# Altium PCB PCB1.PcbDoc (part 1 of 3)
Units mm, origin at the board's own origin, x right, y up, seen from the top; angles counter-clockwise.
Board outline 152.4 x 101.6 mm, 2 copper layers (Top Layer, Bottom Layer); 177 components, 83 nets, 484 pads, 115 vias.
Unrouted connection lines stored in the file: 7.
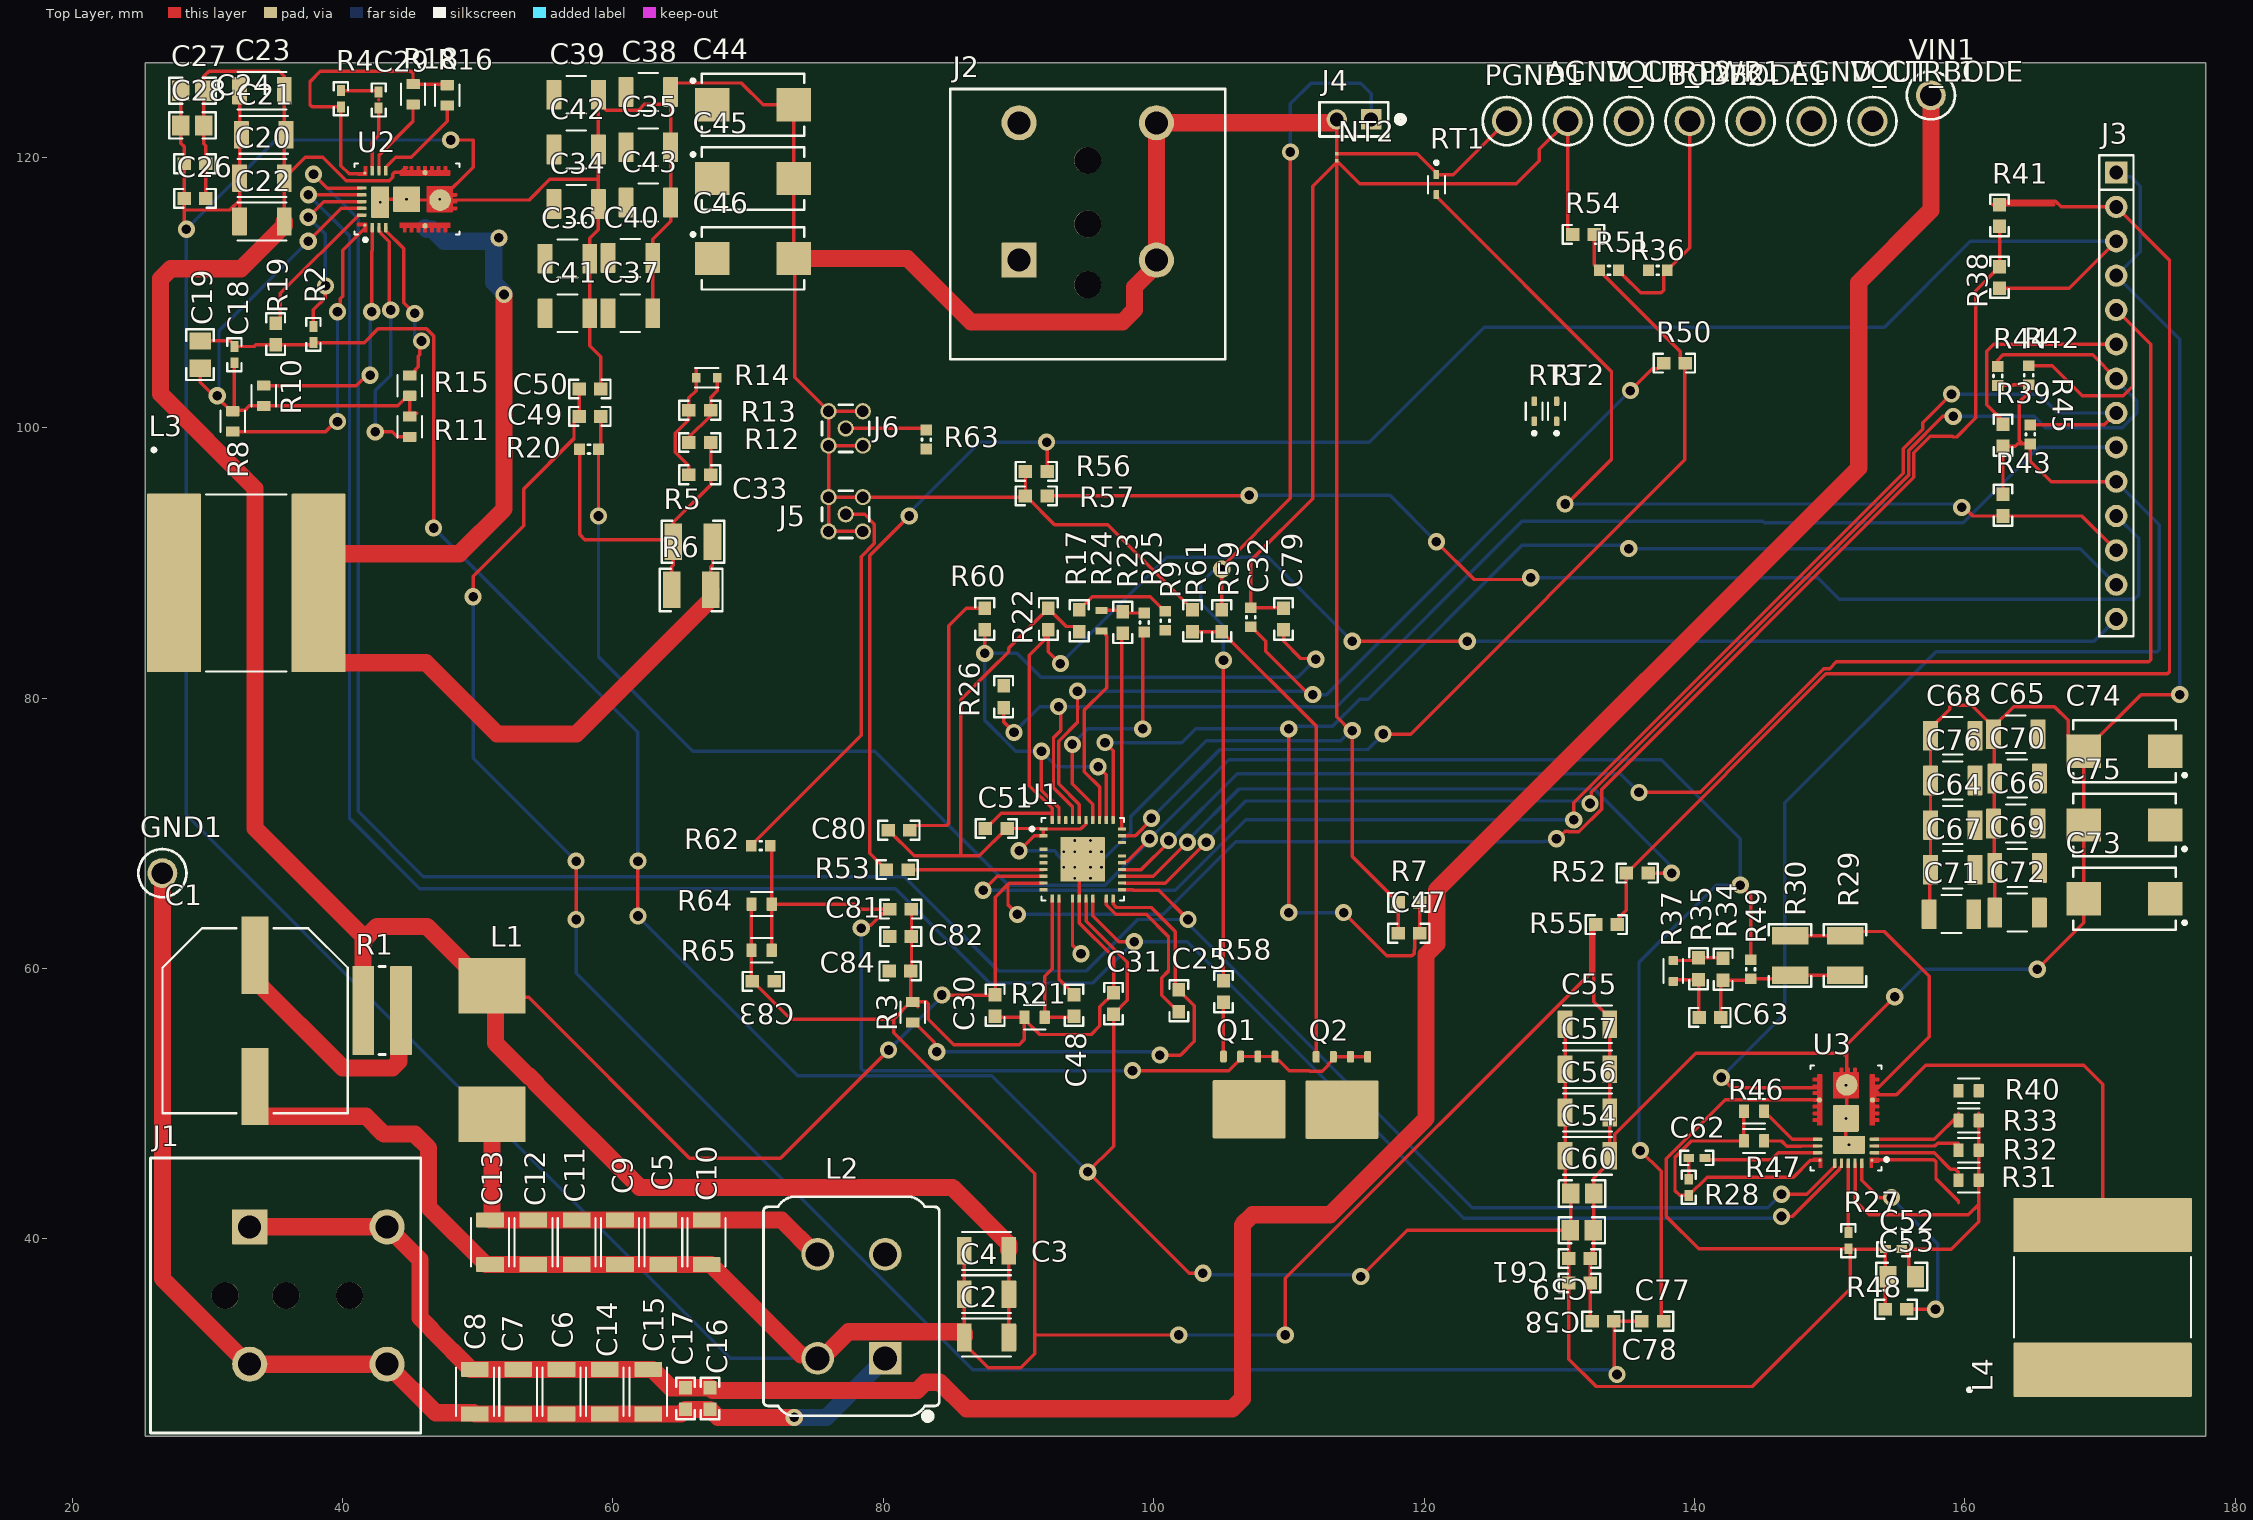
[diagram p0: Top Layer view]
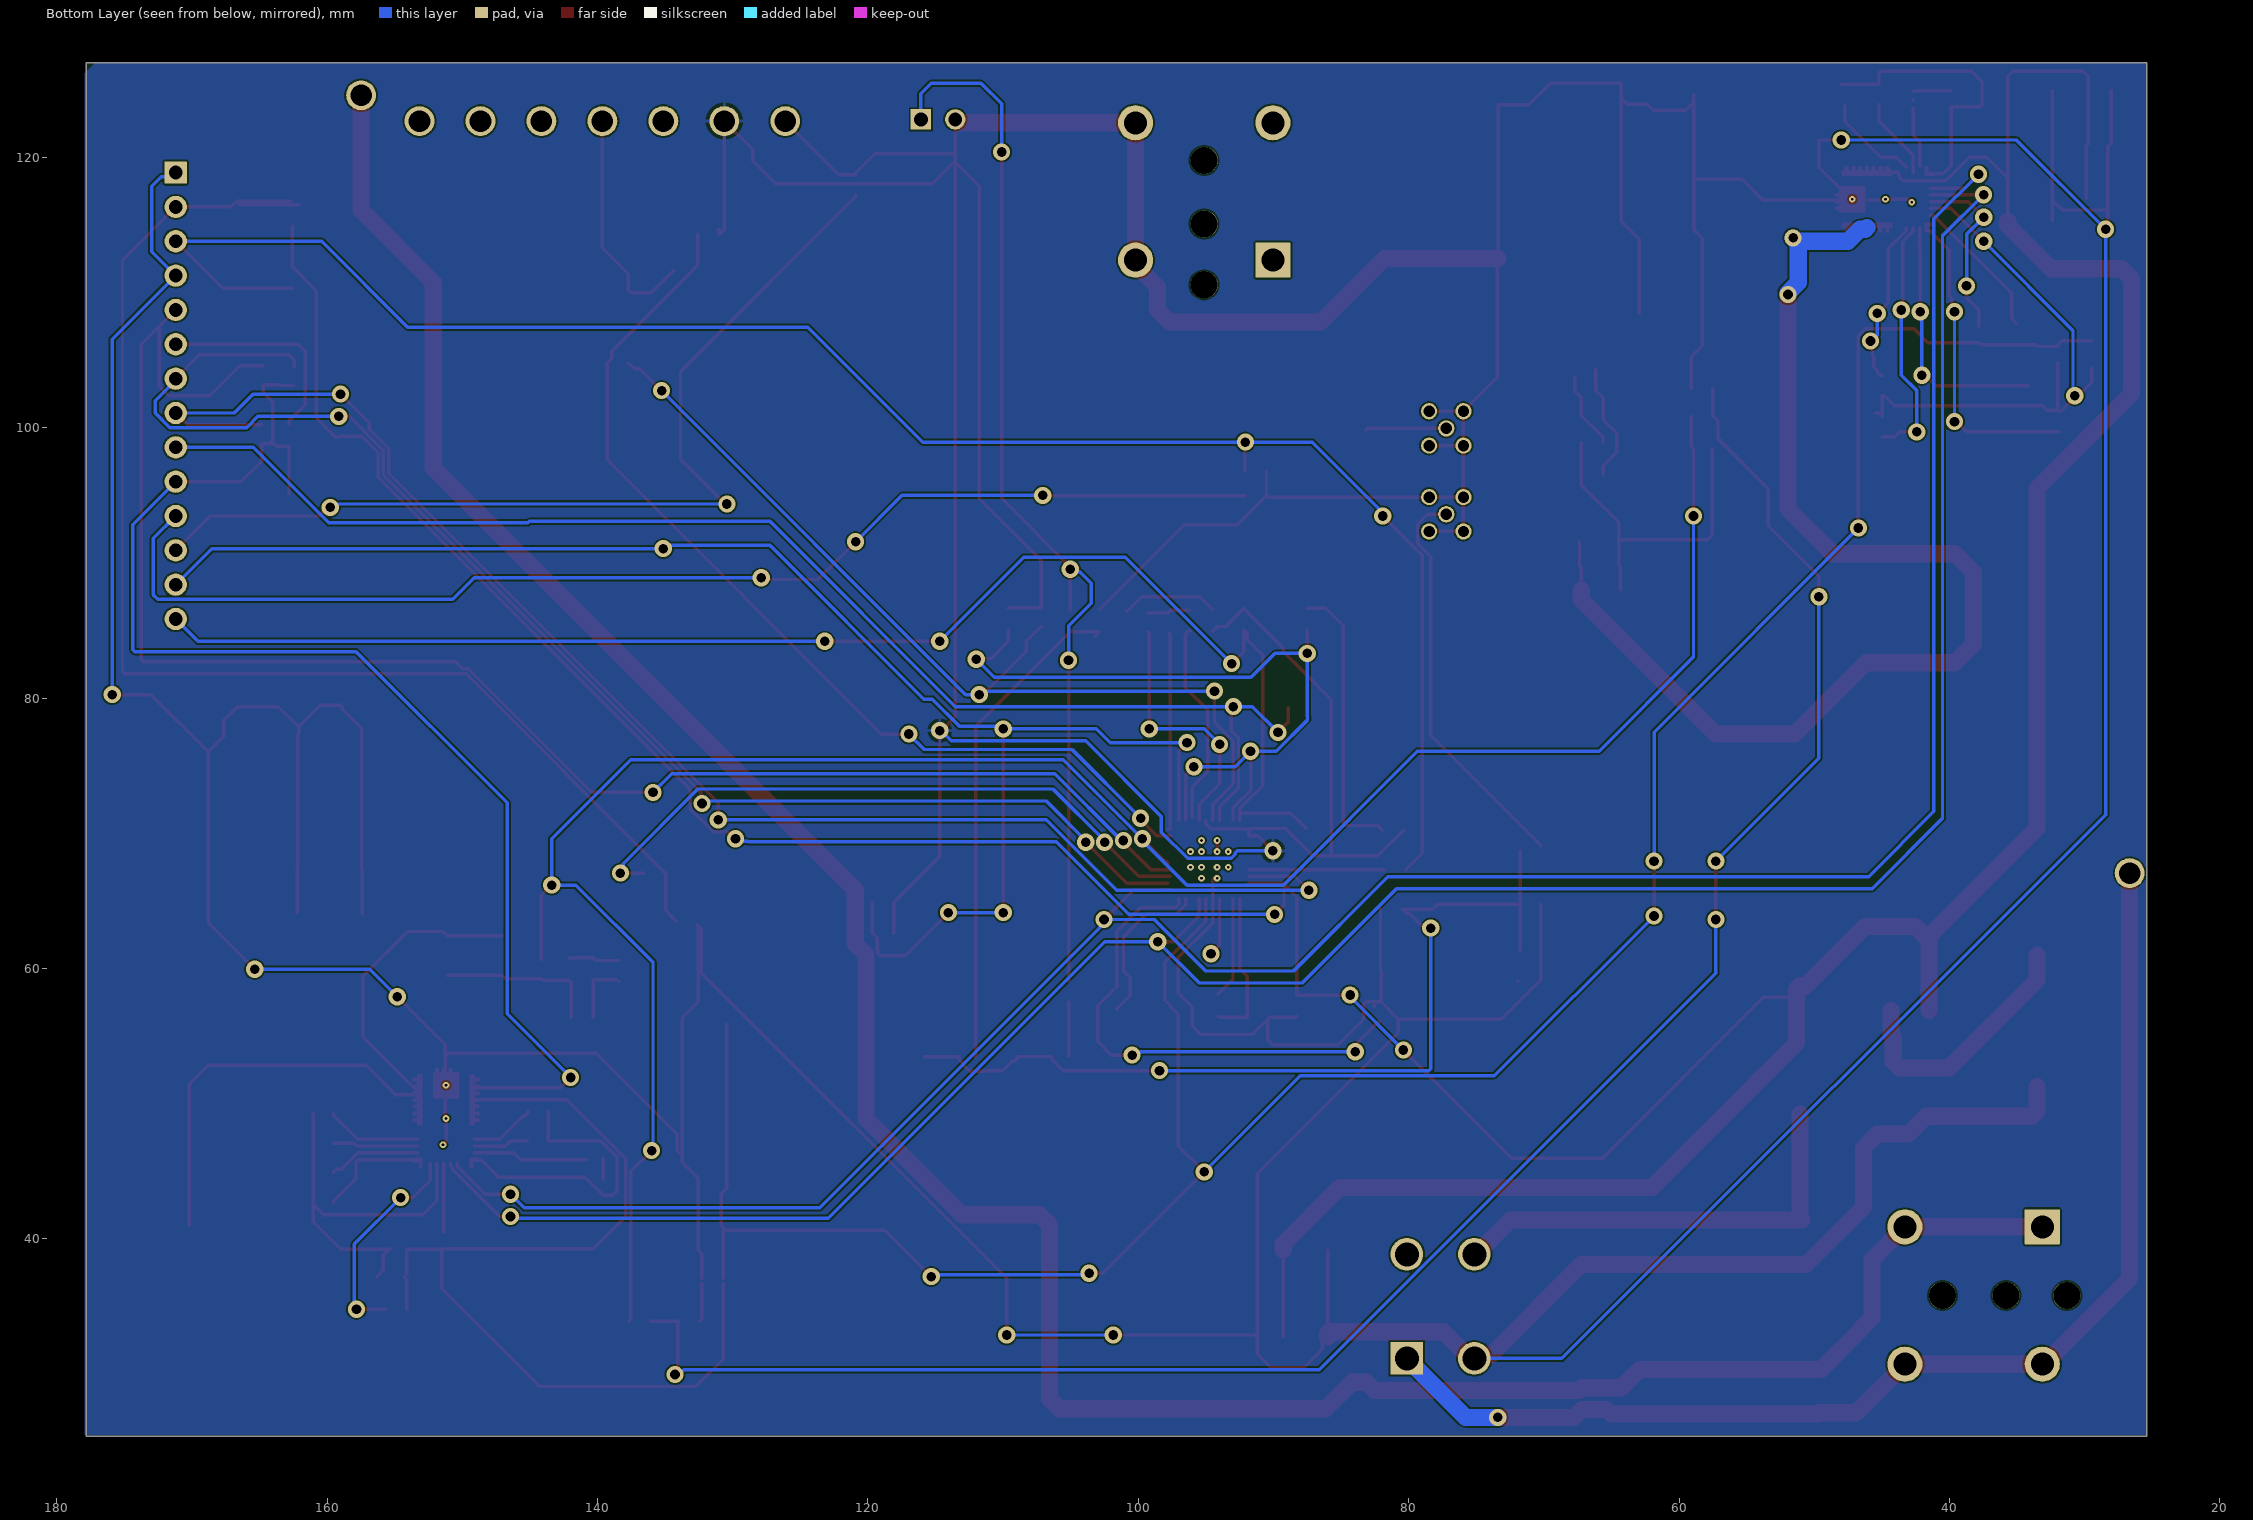
[diagram p1: Bottom Layer view, seen from below]

## Layer stack, top to bottom
Top Solder: solder mask 0.0102, Solder Resist, Dk 3.5
Top Layer: signal copper 0.0356
Dielectric 1: dielectric 0.32, FR-4, Dk 4.8
Bottom Layer: signal copper 0.0356
Bottom Solder: solder mask 0.0102, Solder Resist, Dk 3.5

## Board outline
25.4,25.4 177.8,25.4 177.8,127 25.4,127

## Design rules (kind name [scope] priority, off if disabled: settings)
Clearance [All] p1: gap=0.127 ignorepadtopadclearanceinfootprint=FALSE
PolygonConnect [All] p1: connectstyle=Relief reliefconductorwidth=0.254 reliefentries=4 polygonreliefangle="90 Angle" airgapwidth=0.254
RoutingVias [All] p1: holewidth=0.711 width=1.27 viastyle="Through Hole" minholewidth=0.711 minwidth=1.27 maxholewidth=0.711 maxwidth=1.27
SolderMaskExpansion [All] p1: expansion=0.102 istentingtop=FALSE
Width [All] p1: maxlimit=1.27 minlimit=0.127 preferedwidth=0.254 minimp=50.000000 maximp=50.000000 favimp=50.000000
30 further rules are at their usual default settings.

## Components (designator, comment, footprint, x,y, rotation, side; value= is the part's Value field where it differs from the comment)
AGND_CTRL1 "AGND_CTRL" Keystone5011 148.653,122.682 r90 top
AGND_CTRL2 "AGND_CTRL" Keystone5011 130.619,122.682 r90 top
BODE1 "BODE" Keystone5012 144.145,122.682 r90 top
BODE2 "BODE" Keystone5012 139.636,122.682 r90 top
C1 "EEV-FK1K101Q" SM_RADIAL_H13 33.528,56.134 r270 top value=100uF
C2 "GCJ32DC72A475KE01L" FP-GCJ32DC72A475KE01L_1210-MFG 87.63,32.708 r0 top value=4.7µF
C3 "GCJ32DC72A475KE01L" FP-GCJ32DC72A475KE01L_1210-MFG 87.629,39.116 r0 top value=4.7µF
C4 "GCJ32DC72A475KE01L" FP-GCJ32DC72A475KE01L_1210-MFG 87.63,35.912 r0 top value=4.7µF
C5 "GCJ32DC72A475KE01L" FP-GCJ32DC72A475KE01L_1210-MFG 63.725,39.751 r90 top value=4.7µF
C6 "GCJ32DC72A475KE01L" FP-GCJ32DC72A475KE01L_1210-MFG 56.192,28.702 r90 top value=4.7µF
C7 "GCJ32DC72A475KE01L" FP-GCJ32DC72A475KE01L_1210-MFG 52.988,28.702 r90 top value=4.7µF
C8 "GCJ32DC72A475KE01L" FP-GCJ32DC72A475KE01L_1210-MFG 49.784,28.702 r90 top value=4.7µF
C9 "GCJ32DC72A475KE01L" FP-GCJ32DC72A475KE01L_1210-MFG 60.52,39.751 r90 top value=4.7µF
C10 "GCJ32DC72A475KE01L" FP-GCJ32DC72A475KE01L_1210-MFG 66.929,39.751 r90 top value=4.7µF
C11 "GCJ32DC72A475KE01L" FP-GCJ32DC72A475KE01L_1210-MFG 57.316,39.751 r90 top value=4.7µF
C12 "GCJ32DC72A475KE01L" FP-GCJ32DC72A475KE01L_1210-MFG 54.112,39.751 r90 top value=4.7µF
C13 "GCJ32DC72A475KE01L" FP-GCJ32DC72A475KE01L_1210-MFG 50.908,39.751 r90 top value=4.7µF
C14 "GCJ32DC72A475KE01L" FP-GCJ32DC72A475KE01L_1210-MFG 59.397,28.702 r90 top value=4.7µF
C15 "GCJ32DC72A475KE01L" FP-GCJ32DC72A475KE01L_1210-MFG 62.611,28.702 r90 top value=4.7µF
C16 "GRM188R72A103KA01D" 0603 67.183,28.194 r270 top value=0.01uF
C17 "CGA3E2X7R2A102K080AA" 0603 65.368,28.194 r270 top value=1000pF
C18 "GCM155R71C104JA55D" 0402 32.004,105.41 r270 top value=0.1uF
C19 "GCM21BC71E475KE36L" 0805_HV 29.464,105.41 r270 top value=4.7uF
C20 "GCJ32DC72A475KE01L" FP-GCJ32DC72A475KE01L_1210-MFG 34.036,118.462 r0 top value=4.7µF
C21 "GCJ32DC72A475KE01L" FP-GCJ32DC72A475KE01L_1210-MFG 34.163,121.666 r0 top value=4.7µF
C22 "GCJ32DC72A475KE01L" FP-GCJ32DC72A475KE01L_1210-MFG 34.036,115.258 r0 top value=4.7µF
C23 "GCJ32DC72A475KE01L" FP-GCJ32DC72A475KE01L_1210-MFG 34.036,124.929 r0 top value=4.7µF
C24 "GRM188R72A104KA35D" 0603 29.083,119.527 r180 top value=0.1uF
C25 "CGA3E2X7R1E104K080AA" 0603 101.854,57.62 r270 top value=0.1uF
C26 "GRM188R72A104KA35D" 0603 29.083,116.967 r180 top value=0.1uF
C27 "CL21B224KCFSNWE" 0805 28.89,124.923 r180 top value=0.22uF
C28 "CL21B224KCFSNWE" 0805 28.889,122.362 r180 top value=0.22uF
C29 "GCM155R71C104JA55D" 0402 42.672,124.241 r270 top value=0.1uF
C30 "GRM188R72A104KA35D" 0603 88.265,57.277 r270 top value=0.1uF
C31 "GRM188Z71C475KE21D" 0603 97.028,57.404 r90 top value=4.7uF
C32 "GCM188R71C105KA64J" 0603L 107.188,85.979 r90 top value=1uF
C33 "UMK107AB7105KA-T" 0603 66.421,96.52 r0 top value=1uF
C34 "CGA6P3X7R1E226M250AB" FP-CGA6P3X7R1E226M250AB_1210-MFG 57.277,116.548 r180 top value=22µF
C35 "CGA6P3X7R1E226M250AB" FP-CGA6P3X7R1E226M250AB_1210-MFG 62.612,120.748 r180 top value=22µF
C36 "CGA6P3X7R1E226M250AB" FP-CGA6P3X7R1E226M250AB_1210-MFG 56.635,112.509 r180 top value=22µF
C37 "CGA6P3X7R1E226M250AB" FP-CGA6P3X7R1E226M250AB_1210-MFG 61.289,108.469 r180 top value=22µF
C38 "CGA6P3X7R1E226M250AB" FP-CGA6P3X7R1E226M250AB_1210-MFG 62.612,124.841 r180 top value=22µF
C39 "CGA6P3X7R1E226M250AB" FP-CGA6P3X7R1E226M250AB_1210-MFG 57.277,124.626 r180 top value=22µF
C40 "CGA6P3X7R1E226M250AB" FP-CGA6P3X7R1E226M250AB_1210-MFG 61.289,112.562 r180 top value=22µF
C41 "CGA6P3X7R1E226M250AB" FP-CGA6P3X7R1E226M250AB_1210-MFG 56.635,108.469 r180 top value=22µF
C42 "CGA6P3X7R1E226M250AB" FP-CGA6P3X7R1E226M250AB_1210-MFG 57.277,120.587 r180 top value=22µF
C43 "CGA6P3X7R1E226M250AB" FP-CGA6P3X7R1E226M250AB_1210-MFG 62.612,116.655 r180 top value=22µF
C44 "T598D227M010ATE025" 7343-31 70.358,123.892 r0 top value=220uF
C45 "T598D227M010ATE025" 7343-31 70.358,118.437 r0 top value=220uF
C46 "T598D227M010ATE025" 7343-31 70.358,112.522 r0 top value=220uF
C47 "CGA3E2X7R1E104K080AA" 0603 118.872,62.611 r180 top value=0.1uF
C48 "CGA3E2X7R1E104K080AA" 0603 94.107,57.277 r270 top value=0.1uF
C49 "GCM1885C2A101JA16D" 0603 58.293,100.838 r0 top value=100pF
C50 "CGA3E2X7R1E104K080AA" 0603 58.293,102.87 r0 top value=0.1uF
C51 "CGA3E2X7R1E104K080AA" 0603 88.354,70.358 r0 top value=0.1uF
C52 "GCM155R71C104JA55D" 0402 154.721,39.243 r0 top value=0.1uF
C53 "GCM21BC71E475KE36L" 0805_HV 155.321,37.211 r0 top value=4.7uF
C54 "GCJ32DC72A475KE01L" FP-GCJ32DC72A475KE01L_1210-MFG 132.08,46.145 r180 top value=4.7µF
C55 "GCJ32DC72A475KE01L" FP-GCJ32DC72A475KE01L_1210-MFG 132.08,55.88 r180 top value=4.7µF
C56 "GCJ32DC72A475KE01L" FP-GCJ32DC72A475KE01L_1210-MFG 132.08,49.35 r180 top value=4.7µF
C57 "GCJ32DC72A475KE01L" FP-GCJ32DC72A475KE01L_1210-MFG 132.08,52.554 r180 top value=4.7µF
C58 "GRM188R72A104KA35D" 0603 131.492,36.732 r0 top value=0.1uF
C59 "GRM188R72A104KA35D" 0603 131.492,38.548 r0 top value=0.1uF
C60 "CL21B224KCFSNWE" 0805 131.686,43.359 r0 top value=0.22uF
C61 "CL21B224KCFSNWE" 0805 131.66,40.64 r0 top value=0.22uF
C62 "GCM155R71C104JA55D" 0402 140.173,45.987 r0 top value=0.1uF
C63 "UMK107AB7105KA-T" 0603 141.135,56.388 r0 top value=1uF
C64 "CGA6P3X7R1E226M250AB" FP-CGA6P3X7R1E226M250AB_1210-MFG 159.104,70.606 r0 top value=22µF
C65 "CGA6P3X7R1E226M250AB" FP-CGA6P3X7R1E226M250AB_1210-MFG 163.758,77.329 r0 top value=22µF
C66 "CGA6P3X7R1E226M250AB" FP-CGA6P3X7R1E226M250AB_1210-MFG 163.758,70.72 r0 top value=22µF
C67 "CGA6P3X7R1E226M250AB" FP-CGA6P3X7R1E226M250AB_1210-MFG 159.104,67.302 r0 top value=22µF
C68 "CGA6P3X7R1E226M250AB" FP-CGA6P3X7R1E226M250AB_1210-MFG 159.104,77.216 r0 top value=22µF
C69 "CGA6P3X7R1E226M250AB" FP-CGA6P3X7R1E226M250AB_1210-MFG 163.858,67.44 r0 top value=22µF
C70 "CGA6P3X7R1E226M250AB" FP-CGA6P3X7R1E226M250AB_1210-MFG 163.858,74.049 r0 top value=22µF
C71 "CGA6P3X7R1E226M250AB" FP-CGA6P3X7R1E226M250AB_1210-MFG 159.004,64.022 r0 top value=22µF
C72 "CGA6P3X7R1E226M250AB" FP-CGA6P3X7R1E226M250AB_1210-MFG 163.858,64.135 r0 top value=22µF
C73 "T598D227M010ATE025" 7343-31 171.808,65.164 r180 top value=220uF
C74 "T598D227M010ATE025" 7343-31 171.808,76.073 r180 top value=220uF
C75 "T598D227M010ATE025" 7343-31 171.808,70.619 r180 top value=220uF
C76 "CGA6P3X7R1E226M250AB" FP-CGA6P3X7R1E226M250AB_1210-MFG 159.104,73.911 r0 top value=22µF
C77 "GCM1885C2A101JA16D" 0603 136.906,33.909 r0 top value=100pF
C78 "CGA3E2X7R1E104K080AA" 0603 133.223,33.909 r180 top value=0.1uF
C79 "06035A151JAT2A" 0603 109.601,85.852 r90 top value=150pF
C80 "C0603C472J5RACTU" 0603 81.153,70.231 r180 top value=4700pF
C81 "GRM188R72A104KA35D" 0603 81.28,64.389 r0 top value=0.1uF
C82 "GRM188R72A104KA35D" 0603 81.28,62.357 r0 top value=0.1uF
C83 "GRM188R72A103KA01D" 0603 71.12,59.055 r180 top value=0.01uF
C84 "CGA3E2X7R2A102K080AA" 0603 81.242,59.817 r0 top value=1000pF
GND1 "GND_IN" Keystone5011 26.67,67.056 r0 top
J1 "EM292902-UL" Eaton_EM292902 35.813,35.814 r270 top
J2 "EM292902-UL" Eaton_EM292902 95.123,115.075 r0 top
J3 "TSW-114-07-G-S" TSW-114-07-G-S 171.196,102.362 r270 top
J4 "5-146261-1" CONN_5-146261-1 114.808,122.809 r180 top
J5 "MMCX-J-P-H-ST-TH1" Samtec_MMCX-J-P-H-ST-TH1 77.216,93.599 r0 top
J6 "MMCX-J-P-H-ST-TH1" Samtec_MMCX-J-P-H-ST-TH1 77.216,99.949 r0 top
L1 "VCHA105D-1R0MS6" VCHA105D 51.054,53.975 r90 top value=1uH
L2 "7448421016" WE-CMB_NiZn_S 77.637,35.012 r180 top value=16uH
L3 "VCUD128T-2R5MS8" FP-VCUD128T-2R5MS8_SMT_IND_13MM3_12MM8-MFG 32.877,88.519 r180 top value=2.5uH
L4 "VCUD128T-2R5MS8" FP-VCUD128T-2R5MS8_SMT_IND_13MM3_12MM8-MFG 170.18,35.671 r270 top value=2.5uH
NT2 "Net-Tie" Net-Tie_10mil 113.538,120.015 r270 top net-tie
PGND1 "PGND" Keystone5011 126.111,122.682 r90 top
Q1 "CSD17570Q5B" DNK0008A 107.061,50.673 r270 top value=30V
Q2 "CSD17570Q5B" DNK0008A 113.919,50.646 r270 top value=30V
R1 "RCL12251R00FKEG" FP-RCL12251R00FKEG_2512-MFG 42.921,56.896 r180 top value=1
R2 "CRCW04022R20JNED" 0402 37.846,106.899 r270 top value=2.2
R3 "CRCW06030000Z0EAHP" FP-CRCW06030000Z0EAHP_0603-MFG 82.169,56.769 r90 top value=0
R4 "CRCW04022R20JNED" 0402 39.878,124.333 r90 top value=2.2
R5 "RC1210FR-072K49L" 1210 65.913,91.567 r180 top value=2.49k
R6 "RC1210FR-072KL" 1210 65.786,87.999 r180 top value=2.00k
R7 "CRCW060310K0FKEA" 0603 118.872,64.897 r0 top value=10.0k
R8 "CRCW06030000Z0EAHP" FP-CRCW06030000Z0EAHP_0603-MFG 31.877,100.469 r270 top value=0
R9 "CRCW060352K3FKEA" 0603L 100.838,85.725 r270 top value=52.3k
R10 "CRCW06030000Z0EAHP" FP-CRCW06030000Z0EAHP_0603-MFG 34.163,102.362 r90 top value=0
R11 "CRCW06030000Z0EAHP" FP-CRCW06030000Z0EAHP_0603-MFG 44.958,100.076 r270 top value=0
R12 "CRCW06037K50FKEA" 0603 66.421,98.906 r0 top value=7.50k
R13 "CRCW06030000Z0EA" 0603 66.421,101.293 r180 top value=0
R14 "NCU18WB473J6SRB" FP-NCU18WB473J6SRB_0603-MFG 66.933,103.697 r180 top value=47kΩ
R15 "CRCW06030000Z0EAHP" FP-CRCW06030000Z0EAHP_0603-MFG 44.958,103.112 r90 top value=0
R16 "CRCW06030000Z0EAHP" FP-CRCW06030000Z0EAHP_0603-MFG 47.752,124.587 r270 top value=0
R17 "CRCW060310K0FKEA" 0603 94.488,85.725 r90 top value=10.0k
R18 "CRCW06030000Z0EAHP" FP-CRCW06030000Z0EAHP_0603-MFG 45.212,124.664 r270 top value=0
R19 "CRCW06034K70JNEA" 0603 35.052,106.934 r90 top value=4.7k
R20 "CRCW060349R9FKEA" 0603L 58.228,98.425 r180 top value=49.9
R21 "CRCW06030000Z0EAHP" FP-CRCW06030000Z0EAHP_0603-MFG 91.186,56.388 r180 top value=0
R22 "CRCW060310K0FKEA" 0603 92.202,85.852 r270 top value=10.0k
R23 "CRCW060341K2FKEA" 0603 97.703,85.598 r270 top value=41.2k
R24 "CRCW060320K0FKEA" 0603S 96.123,85.725 r270 top value=20.0k
R25 "CRCW060352K3FKEA" 0603L 99.314,85.598 r270 top value=52.3k
R26 "CRCW060310K0FKEA" 0603 88.9,80.099 r90 top value=10.0k
R27 "CRCW04022R20JNED" 0402 151.384,39.878 r270 top value=2.2
R28 "CRCW04022R20JNED" 0402 139.573,43.815 r90 top value=2.2
R29 "RC1210FR-072K49L" 1210 151.13,60.96 r270 top value=2.49k
R30 "RC1210FR-072KL" 1210 147.066,60.96 r270 top value=2.00k
R31 "CRCW06030000Z0EAHP" FP-CRCW06030000Z0EAHP_0603-MFG 160.274,44.35 r180 top value=0
R32 "CRCW06030000Z0EAHP" FP-CRCW06030000Z0EAHP_0603-MFG 160.274,46.554 r180 top value=0
R33 "CRCW06030000Z0EAHP" FP-CRCW06030000Z0EAHP_0603-MFG 160.274,48.759 r180 top value=0
R34 "CRCW06037K50FKEA" 0603 142.113,59.944 r270 top value=7.50k
R35 "CRCW06030000Z0EA" 0603 140.298,59.982 r270 top value=0
R36 "CRCW060349R9FKEA" 0603L 137.287,111.633 r180 top value=49.9
R37 "NCU18WB473J6SRB" FP-NCU18WB473J6SRB_0603-MFG 138.43,59.817 r270 top value=47kΩ
R38 "CRCW0603191KFKEA" 0603 162.56,111.125 r90 top value=191k
R39 "CRCW060310K0FKEA" 0603 162.814,99.441 r270 top value=10.0k
R40 "CRCW06030000Z0EAHP" FP-CRCW06030000Z0EAHP_0603-MFG 160.274,50.963 r180 top value=0
R41 "CRCW0603191KFKEA" 0603 162.56,115.697 r270 top value=191k
R42 "CRCW0603100KFKEA" 0603L 164.719,103.886 r270 top value=100k
R43 "CRCW060310K0FKEA" 0603 162.814,94.272 r90 top value=10.0k
R44 "CRCW0603100KFKEA" 0603L 162.433,103.824 r270 top value=100k
R45 "CRCW0603100KFKEA" 0603L 164.846,99.506 r270 top value=100k
R46 "CRCW06030000Z0EAHP" FP-CRCW06030000Z0EAHP_0603-MFG 144.399,49.448 r0 top value=0
R47 "CRCW06030000Z0EAHP" FP-CRCW06030000Z0EAHP_0603-MFG 144.399,47.244 r0 top value=0
R48 "CRCW06034K70JNEA" 0603 154.902,34.798 r0 top value=4.7k
R49 "CRCW060349R9FKEA" 0603L 144.145,59.944 r270 top value=49.9
R50 "RC0603FR-0724K9L" 0603 138.509,104.775 r180 top value=24.9k
R51 "CRCW060352K3FKEA" 0603L 133.669,111.633 r0 top value=52.3k
R52 "CRCW06034K99FKEA" 0603 135.763,67.056 r0 top value=4.99k
R53 "CRCW06034K99FKEA" 0603 81.026,67.31 r0 top value=4.99k
R54 "CRCW060310K0FKEA" 0603 131.788,114.3 r0 top value=10.0k
R55 "CRCW060310K0FKEA" 0603 133.477,63.246 r0 top value=10.0k
R56 "CRCW060310K0FKEA" 0603 91.313,96.774 r0 top value=10.0k
R57 "CRCW060310K0FKEA" 0603 91.313,94.959 r0 top value=10.0k
R58 "CRCW06031R00JNEA" 0603 105.156,58.293 r90 top value=1.0
R59 "CRCW06031R00JNEA" 0603 105.029,85.725 r270 top value=1.0
R60 "CRCW06037K50FKEA" 0603 87.503,85.852 r270 top value=7.50k
R61 "CRCW060310K0FKEA" 0603 102.87,85.725 r270 top value=10.0k
R62 "CRCW060349R9FKEA" 0603L 70.931,69.088 r0 top value=49.9
R63 "CRCW060349R9FKEA" 0603L 83.185,99.125 r90 top value=49.9
R64 "CRCW06030000Z0EAHP" FP-CRCW06030000Z0EAHP_0603-MFG 70.993,64.77 r0 top value=0
R65 "CRCW06030000Z0EAHP" FP-CRCW06030000Z0EAHP_0603-MFG 70.993,61.341 r0 top value=0
RT1 "TMP6131QDYARQ1" DYA0002A-MFG 120.904,117.983 r270 top value=10kΩ
RT2 "TMP6131QDYARQ1" DYA0002A-MFG 129.794,101.219 r90 top value=10kΩ
RT3 "TMP6131QDYARQ1" DYA0002A-MFG 128.14,101.219 r90 top value=10kΩ
U1 "LM5137FDQRHARQ1" RHA0036D-MFG 94.742,68.072 r0 top
U2 "LMG2100R026VBNR" VBN0016A-MFG 44.766,116.903 r90 top
U3 "LMG2100R026VBNR" VBN0016A-MFG 151.198,48.946 r180 top
VIN1 "VIN" Keystone5010 157.48,124.587 r0 top
VOUT_BODE "VOUT" Keystone5010 153.162,122.682 r90 top
VOUT_PWR1 "VOUT" Keystone5010 135.128,122.682 r90 top

## Footprints (in the part's own frame and the unit in brackets; to place one, negate y for a bottom-side part, rotate by r counter-clockwise, add the part's x,y. Pads: shape width x height; smd on the part's side, far side on the other; paste and mask are expansions set on the pad)
0402 [mm] "0402 from SM-752 data"
  rect 0.8x0.6 smd: 1(-0.6,0) 2(0.6,0)
  silkscreen extent -1.22,-0.52 1.22,0.52, body extent -0.55,-0.3 0.55,0.3, height 0.6
0603 [mm] "0603 from SM-752 data"
  rect 1x0.95 smd: 1(-0.8,0) 2(0.8,0)
  silkscreen extent -1.52,-0.69 1.52,0.69, body extent -0.87,-0.47 0.87,0.47, height 1
0603L [mm] "0603 from SM-752 data"
  rect 0.8x0.85 smd: 1(-0.7,0) 2(0.7,0)
  silkscreen extent -0.07,-0.33 0.07,0.33, body extent -0.87,-0.47 0.87,0.47, height 1
0603S [mil]
  rect 20x35 smd: 1(-30,0) 2(30,0)
  body extent -34,-19 34,19, height 39
0805 [mm] "0805 from SM-752 data"
  rect 1.3x1.5 smd: 1(-0.85,0) 2(0.85,0)
  silkscreen extent -1.72,-0.97 1.72,0.97, body extent -1.1,-0.72 1.1,0.72, height 1.45
0805_HV [mil] "0805 with 30mil clearance between pads"
  rect 50x63 smd: 1(-40,0) 2(40,0)
  silkscreen extent -74,-40 74,40, body extent -43,-29 43,29, height 57
1210 [mm] "1210 from SM-752 data"
  rect 1.3x2.7 smd: 1(-1.45,0) 2(1.45,0)
  silkscreen extent -2.32,-1.57 2.32,1.57, body extent -1.7,-1.35 1.7,1.35, height 1.35
7343-31 [mm] "Medium Density based on Kemet T495 dimensions"
  rect 2.55x2.45 smd: 1(-3.025,0) 2(3.025,0)
  silkscreen extent -4.56,-2.3 3.8,2.3, body extent -3.8,-2.3 3.8,2.3, height 3.1
CONN_5-146261-1 [mm] "Sullins"
  rect 1.5x1.5 hole 1.02: 1(-1.27,0)
  round 1.5 hole 1.02: 2(1.27,0)
  silkscreen extent -3.68,-1.27 2.54,1.27, body extent -2.51,-1.27 2.51,1.27, height 10.87
DNK0008A [mm] "SON, 8-Leads, Body 5x6mm"
  rrect39% 0.86x0.51 smd paste-0.05 mask-0.05: 1(-2.82,1.905) 2(-2.82,0.635) 3(-2.82,-0.635) 4(-2.82,-1.905) 5(2.82,-1.905) 6(2.82,-0.635) 7(2.82,0.635) 8(2.82,1.905)
  rrect50% 0.25x0.555 on Top Paste: 9(-0.83,2.373) 9(-0.83,-2.373)
  rrect50% 0.25x0.555 on Top Solder: 9(-0.83,2.373) 9(-0.83,-2.373)
  rrect50% 0.95x1.13 on Top Paste: 9(-0.535,1.33) 9(-0.535,0) 9(-0.535,-1.33) 9(0.615,1.33) 9(0.615,0) 9(0.615,-1.33) 9(1.765,1.33) 9(1.765,0) 9(1.765,-1.33)
  rrect50% 3.58x4 on Top Solder: 9(0.75,0)
  rrect5% 4.34x5.4 smd paste-3 mask-3: 9(1.08,0)
  body extent -3.05,-2.55 3.05,2.55, height 1.06
DYA0002A-MFG [mm]
  rrect25% 0.67x0.4 smd paste+0 mask+0: 1(-0.74,0) 2(0.74,0)
  silkscreen extent -1.75,-0.62 0.65,0.62, body extent -1.17,-0.67 1.17,0.67, height 0.25
Eaton_EM292902 [mm] "Terminal Block, 10.16mm, 2x1, TH"
  round 2.6 hole 1.7 paste-2539.97 mask+0: 1(-5.08,7.48) 2(5.08,7.48) 2(5.08,-2.68)
  rrect4% 2.6x2.6 hole 1.7 paste-2539.97 mask+0: 1(-5.08,-2.68)
  round 2 hole 2 unplated paste-2539.97 mask+0: ""(0,4.7) ""(0,0) ""(0,-4.5)
  silkscreen extent -10.17,-10.02 10.17,9.98, body extent -10.27,-10.12 10.27,10.08, height 0.25
FP-CGA6P3X7R1E226M250AB_1210-MFG [mm]
  rrect9% 1.1x2.2 smd paste+0 mask+0: 1(-1.65,0) 2(1.65,0)
  silkscreen extent -0.73,-1.4 0.73,1.4, body extent -1.6,-1.25 1.6,1.25, height 2.81
FP-CRCW06030000Z0EAHP_0603-MFG [mm]
  rrect13% 0.75x1 smd paste+0 mask+0: 1(-0.75,0) 2(0.75,0)
  silkscreen extent -0.8,-0.9 0.8,0.9, body extent -0.8,-0.43 0.8,0.43, height 0.55
FP-GCJ32DC72A475KE01L_1210-MFG [mm]
  rrect9% 1.1x2.05 smd paste+0 mask+0: 1(-1.65,0) 2(1.65,0)
  silkscreen extent -1.8,-1.4 1.8,1.4, body extent -1.6,-1.25 1.6,1.25, height 2.3
FP-NCU18WB473J6SRB_0603-MFG [mm]
  rrect15% 0.65x0.7 smd paste+0 mask+0: 1(-0.775,0) 2(0.775,0)
  silkscreen extent -0.87,-0.73 0.87,0.73, body extent -0.8,-0.4 0.8,0.4, height 0.95
FP-RCL12251R00FKEG_2512-MFG [mm]
  rrect6% 1.6x6.6 smd paste+0 mask+0: 1(-1.4,0) 2(1.4,0)
  silkscreen extent -0.22,-3.25 0.22,3.25, body extent -1.6,-3.15 1.6,3.15, height 0.8
FP-VCUD128T-2R5MS8_SMT_IND_13MM3_12MM8-MFG [mm]
  rrect3% 4x13.2 smd paste+0 mask+0: 1(-5.35,0) 2(5.35,0)
  silkscreen extent -2.98,-9.97 6.96,6.55, body extent -7.45,-6.7 7.45,6.7, height 0.25
Keystone5010 [mil] "Keystone Multipurpose loops"
  round 87 hole 63: 1(0,0)
  silkscreen extent -70,-70 70,70, body extent -63,-63 63,62, height 319
Keystone5011 [mil] "Keystone Multipurpose loops"
  round 87 hole 63: 1(0,0)
  silkscreen extent -70,-70 70,70, body extent -63,-63 63,62, height 319
Keystone5012 [mil] "Keystone Multipurpose loops"
  round 87 hole 63: 1(0,0)
  silkscreen extent -70,-70 70,70, body extent -63,-63 63,62, height 319
Net-Tie_10mil [mil] "10mil net tie, no solder mask opening, no solder paste"
  rect 10x10 smd paste-5 mask-5: 1(-10,0) 2(10,0)
  Top Layer region: -6,5 6,5 6,-5 -6,-5
RHA0036D-MFG [mm]
  rrect40% 0.6x0.25 smd paste+0 mask+0: 1(-2.9,2.25) 2(-2.9,1.75) 3(-2.9,0.75) 4(-2.9,0.25) 5(-2.9,-0.25) 6(-2.9,-0.75) 7(-2.9,-1.25) 8(-2.9,-1.75) 9(-2.9,-2.25) 18(2.9,-2.25) 19(2.9,-1.75) 20(2.9,-1.25) 21(2.9,-0.75) 22(2.9,-0.25) 23(2.9,0.25) 24(2.9,1.25) 25(2.9,1.75) 26(2.9,2.25)
  rrect40% 0.25x0.6 smd paste+0 mask+0: 10(-2.25,-2.9) 11(-1.75,-2.9) 12(-0.75,-2.9) 13(-0.25,-2.9) 14(0.25,-2.9) 15(0.75,-2.9) 16(1.75,-2.9) 17(2.25,-2.9) 27(2.25,2.9) 28(1.75,2.9) 29(1.25,2.9) 30(0.75,2.9) 31(0.25,2.9) 32(-0.25,2.9) 33(-0.75,2.9) 34(-1.25,2.9) 35(-1.75,2.9) 36(-2.25,2.9)
  rrect3% 3.3x3.3 smd paste-1000 mask+0: 37(0,0)
  silkscreen extent -3.87,-3.05 3.05,3.05, body extent -3.3,-3.3 3.3,3.3, height 0.25
Samtec_MMCX-J-P-H-ST-TH1 [mm] "Connector, MMCX, TH"
  round 1.2 hole 0.84: 1(0,0) 2(-1.27,1.27) 3(1.27,1.27) 4(1.27,-1.27) 5(-1.27,-1.27)
  silkscreen extent -1.75,-1.75 1.75,1.75, body extent -1.75,-1.75 1.75,1.75, height 4.35
SM_RADIAL_H13 [mm] "12.5 x 13.5mm:  Panasonic H13"
  rect 5.7x2 smd: 1(-4.85,0) 2(4.85,0)
  silkscreen extent -6.85,-6.85 6.85,6.85, body extent -6.85,-6.85 6.85,6.85, height 14
TSW-114-07-G-S [mm] "Samtec 100mil, 1x14, 230 mil above insulator"
  rrect6% 1.65x1.65 hole 1.016: 1(-16.51,0)
  round 1.65 hole 1.016: 2(-13.97,0) 3(-11.43,0) 4(-8.89,0) 5(-6.35,0) 6(-3.81,0) 7(-1.27,0) 8(1.27,0) 9(3.81,0) 10(6.35,0) 11(8.89,0) 12(11.43,0) 13(13.97,0) 14(16.51,0)
  silkscreen extent -17.78,-1.27 17.78,1.27, body extent -17.78,-1.27 17.78,1.27, height 8.38
VBN0016A-MFG [mm]
  round 0.228 smd paste+0 mask+0: 1(-1.925,3.125) 11(1.925,3.125)
  rrect40% 0.7x0.25 smd paste+0 mask+0: 2(-2.1,2.575) 3(-2.1,2.075) 4(-2.1,1.575) 8(2.1,1.575) 9(2.1,2.075) 10(2.1,2.575)
  round 0.394 smd paste+0 mask+0: 5(-1.969,-1.335) 7(1.969,-1.335)
  rrect8% 2.35x1.33 smd paste-1000 mask+0: 6(-0.225,1.985)
  round 1.603 smd paste-1000 mask+0: 6(-0.059,-2.453)
  rrect5% 1.9x1.976 smd paste-1000 mask+0: 6(0,0.032)
  rrect40% 0.25x0.7 smd paste+0 mask+0: 12(0.825,3.35) 13(0.325,3.35) 14(-0.175,3.35) 15(-0.675,3.35) 16(-1.175,3.35)
  Top Layer region: 225 vertices and 0 holes, not listed, extent -2.45,-3.216 -1.75,0.542
  Top Layer region: 225 vertices and 0 holes, not listed, extent 1.75,-3.216 2.45,0.542
  Top Layer region: -2.4,2.95 -2.41,2.95 -2.428,2.958 -2.442,2.972 -2.45,2.99 -2.45,3 -2.45,3 -2.45,3.15 -2.45,3.16 -2.442,3.178 -2.428,3.192 -2.41,3.2 -2.4,3.2 -2.4,3.2 -2.05,3.2 -2.04,3.201 -2.022,3.208 -2.008,3.222 -2.001,3.24 -2,3.25 -2,3.25 -2,3.65 -2,3.66 -1.992,3.678 -1.978,3.692 -1.96,3.7 -1.95,3.7 -1.95,3.7 -1.8,3.7 -1.79,3.7 -1.772,3.692 -1.758,3.678 -1.75,3.66 -1.75,3.65 -1.75,3.65 -1.75,3 -1.75,2.99 -1.758,2.972 -1.772,2.958 -1.79,2.95 -1.8,2.95 -1.8,2.95
  Top Layer region: 2.4,2.95 2.41,2.95 2.428,2.958 2.442,2.972 2.45,2.99 2.45,3 2.45,3 2.45,3.15 2.45,3.16 2.442,3.178 2.428,3.192 2.41,3.2 2.4,3.2 2.4,3.2 2.05,3.2 2.04,3.201 2.022,3.208 2.008,3.222 2.001,3.24 2,3.25 2,3.25 2,3.65 2,3.66 1.992,3.678 1.978,3.692 1.96,3.7 1.95,3.7 1.95,3.7 1.8,3.7 1.79,3.7 1.772,3.692 1.758,3.678 1.75,3.66 1.75,3.65 1.75,3.65 1.75,3 1.75,2.99 1.758,2.972 1.772,2.958 1.79,2.95 1.8,2.95 1.8,2.95
  Top Layer region: -0.55,-3.65 -0.55,-3.66 -0.558,-3.678 -0.572,-3.692 -0.59,-3.7 -0.6,-3.7 -0.6,-3.7 -0.75,-3.7 -0.76,-3.7 -0.778,-3.692 -0.792,-3.678 -0.8,-3.66 -0.8,-3.65 -0.8,-3.65 -0.8,-3.425 -0.801,-3.415 -0.808,-3.397 -0.822,-3.383 -0.84,-3.376 -0.85,-3.375 -0.85,-3.375 -0.9,-3.375 -0.91,-3.375 -0.928,-3.367 -0.942,-3.353 -0.95,-3.335 -0.95,-3.325 -0.95,-3.325 -0.95,-1.506 -0.95,-1.496 -0.942,-1.478 -0.928,-1.464 -0.91,-1.456 -0.9,-1.456 -0.9,-1.456 0.9,-1.456 0.91,-1.456 0.928,-1.464 0.942,-1.478 0.95,-1.496 0.95,-1.506 0.95,-1.506 0.95,-3.325 0.95,-3.335 0.942,-3.353 0.928,-3.367 0.91,-3.375 0.9,-3.375 0.9,-3.375 0.5,-3.375 0.49,-3.376 0.472,-3.383 0.458,-3.397 0.451,-3.415 0.45,-3.425 0.45,-3.425 0.45,-3.65 0.45,-3.66 0.442,-3.678 0.428,-3.692 0.41,-3.7 0.4,-3.7 0.4,-3.7 0.25,-3.7 0.24,-3.7 0.222,-3.692 0.208,-3.678 0.2,-3.66 0.2,-3.65 0.2,-3.65 0.2,-3.425 0.199,-3.415 0.192,-3.397 0.178,-3.383 0.16,-3.376 0.15,-3.375 0.15,-3.375 0,-3.375 -0.01,-3.376 -0.028,-3.383 -0.042,-3.397 -0.049,-3.415 -0.05,-3.425 -0.05,-3.425 -0.05,-3.65 -0.05,-3.66 -0.058,-3.678 -0.072,-3.692 -0.09,-3.7 -0.1,-3.7 -0.1,-3.7 -0.25,-3.7 -0.26,-3.7 -0.278,-3.692 -0.292,-3.678 -0.3,-3.66 -0.3,-3.65 -0.3,-3.65 -0.3,-3.425 -0.301,-3.415 -0.308,-3.397 -0.322,-3.383 -0.34,-3.376 -0.35,-3.375 -0.35,-3.375 -0.5,-3.375 -0.51,-3.376 -0.528,-3.383 -0.542,-3.397 -0.549,-3.415 -0.55,-3.425 -0.55,-3.425
  silkscreen extent -3.12,-3.88 2.62,3.87, body extent -2.55,-3.8 2.55,3.8, height 0.25
VCHA105D [mm] "SMD, 2-Leads, Body 10.85x10mm"
  rrect2% 4.1x4.95 smd: 1(-4.75,0) 2(4.75,0)
  body extent -5.6,-5.15 5.6,5.15, height 5.4
WE-CMB_NiZn_S [mil] "TH, 4-Leads, Body 18.5x14.5mm"
  rect 95x95 hole 70: 1(-98.42,151.58)
  round 95 hole 70: 2(98.43,151.58) 3(98.43,-151.57) 4(-98.42,-151.57)
  silkscreen extent -256,-319 256,330, body extent -257,-319 257,319, height 770

## Part data
AGND_CTRL1 AGND_CTRL2: library part 5011_AGND_CTRL, "Test Point, Multipurpose, Black, TH", Color=Black, Manufacturer="Keystone Electronics", PartNumber=5011, Supplier Part Number 1=36-5011-ND, CNHeader=FALSE, ComponentLink1Description="Datasheet URL", ComponentLink1URL=http://www.keyelco.com/userAssets/file/M60-2p60.pdf, CompType="Test Point", ContactFinish=Silver, CT=TRUE, Green_EU RoHS=Passed, Green_EU RoHS-2=Incomplete, Green_Lifecycle=Active, Green_REACh=Passed, LatestRevisionDate=26/05/2017, MountType=TH, PackageReference="Black Multipurpose Testpoint", Publisher="Texas Instruments", RoHS=Y, Supplier 1=Digi-Key, Supplier 2=Mouser, Supplier Part Number 2=534-5011
BODE1 BODE2: library part 5012, "Test Point, Multipurpose, White, TH", Color=White, Manufacturer="Keystone Electronics", Supplier Part Number 1=36-5012-ND, CNHeader=FALSE, ComponentLink1Description="Datasheet URL", ComponentLink1URL=http://www.keyelco.com/userAssets/file/M60-2p60.pdf, CompType="Test Point", ContactFinish=Silver, CT=TRUE, Green_EU RoHS=Passed, Green_EU RoHS-2=Incomplete, Green_Lifecycle=Active, Green_REACh=Passed, LatestRevisionDate=26/05/2017, MountType=TH, PackageReference="White Multipurpose Testpoint", PartNumber=5012, Publisher="Texas Instruments", RoHS=Y, Supplier 1=Digi-Key, Supplier 2=Mouser, Supplier Part Number 2=534-5012
C1: library part CMP-0011216-2, "CAP, AL, 100 uF, 80 V, +/- 20%, 0.32 ohm, AEC-Q200 Grade 2, SMD", Cap_Case=H13, Manufacturer=Panasonic, Supplier Part Number 1=PCE3493CT-ND, Tolerance_%=20%, Value1="0.32 ohm", Value2=80V, ValueDisplayed=100uF, AEC Category=Q200, AEC Grade=2, AEC Qualified=Y, Cap_F=100µF, ComponentLink1Description="Datasheet link", ComponentLink1URL=https://industrial.panasonic.com/cdbs/www-data/pdf/RDE0000/ABA0000C1181.pdf, CompType=Capacitor, ESR_ohm=0.32, IRMS_A=500mA, LatestRevisionDate=2017-03-09, MountType=SMT, PackageReference="SMT Radial H13", PartNumber=EEV-FK1K101Q, Polarized=Y, Publisher="Texas Instruments", RoHS=Y, Series=FK, SizeArea_mm2=202.5, SizeAreaWB_mm2=263.5, SizeX_mm=15, SizeY_mm=13.5, SizeZ_mm=13.5, Supplier 1=Digi-Key, Supplier 2=Mouser, Supplier 3=Farnell, Supplier Part Number 2=667-EEV-FK1K101Q, Supplier Part Number 3=9696113, TaMax_C=105°C, TaMin_C=-55°C, Technology=AL, U/M=EA, VDC_V=80V
C2 C3 C4 C5 C6 C7 C8 C9 C10 C11 C12 C13 C14 C15 C20 C21 C22 C23 C54 C55 C56 C57: library part CMP-0093675-1, "4.7uF ±10% 100V Ceramic Capacitor X7S 1210 (3225 Metric)", Manufacturer=Murata, Operating Temperature Range="-55°C to +125°C", TempCo=22%, Temperature Characteristic=X7S, Tolerance_%=10%, ValueDisplayed=4.7uF, AEC Grade="Grade 1", AEC Qualified=Yes, Cap_F=4.7µF, ComponentLink1Description=Datasheet, ComponentLink1URL=https://www.murata.com/en-us/products/productdetail?partno=GCJ32DC72A475KE01%23, datasheet=https://www.murata.com/en-us/products/productdetail?partno=GCJ32DC72A475KE01%23, Datasheet Path=datasheets/Cap-GCJ32DC72A475KE01L.pdf, helpURL=https://upverter.com/upn/revision/54580131a15fb126/, Lead Free=Yes, PackageReference=1210, Part Number=GCJ32DC72A475KE01L, PartNumber=GCJ32DC72A475KE01L, RoHS=TRUE, SizeZ_mm=2.3mm, VDC_V=100V
C16: library part CMP-0007468-5, "CAP, CERM, 0.01 uF, 100 V, +/- 10%, X7R, 0603", Cap_Case=0603, Manufacturer=MuRata, Supplier Part Number 1=GRM188R72A103KA01D-ND, TempCo=X7R, Tolerance_%=10%, Value1=Unknown, Value2=100V, ValueDisplayed=0.01uF, AEC Category=Q200, AEC Qualified=?, Cap_F=10nF, ComponentLink1Description="Datasheet link", ComponentLink1URL=http://search.murata.co.jp/Ceramy/PnsearchViewAction.do?HnOFG=ON&HnNFG=ON&SEL_CNT=50&sLang=en&sKey=GRM188R72A103KA01D&x=9&y=9&search=startwith, CompType=Capacitor, LatestRevisionDate=2017-03-09, MountType=SMT, PackageReference=0603, PartNumber=GRM188R72A103KA01D, Polarized=N, Published=2008-06-19, Publisher="Texas Instruments", RoHS=Y, SizeArea_mm2=1.28, SizeAreaWB_mm2=4.68, SizeX_mm=1.6, SizeY_mm=0.8, SizeZ_mm=1, Supplier 1=Digi-Key, Supplier 2=Mouser, Supplier Part Number 2=81-GRM188R72A103KA1D, TaMax_C=125°C, TaMin_C=-55°C, Technology=Ceramic, U/M=EA, VDC_V=100V
C17: library part CMP-0007081-4, "CAP, CERM, 1000 pF, 100 V, +/- 10%, X7R, AEC-Q200 Grade 1, 0603", Cap_Case=0603, Manufacturer=TDK, Supplier Part Number 1=445-5806-1-ND, TempCo=X7R, Tolerance_%=10%, Value1="1.97137 ohm", Value2=100V, ValueDisplayed=1000pF, AEC Category=Q200, AEC Grade=1, AEC Qualified=Y, Cap_F=0.001uF, ComponentLink1Description="Datasheet link", ComponentLink1URL=https://product.tdk.com/en/search/capacitor/ceramic/mlcc/info?part_no=CGA3E2X7R2A102K080AA, CompType=Capacitor, ESR_ohm=1.9714, IRMS_A=305.705mA, LatestRevisionDate=2017-03-09, MountType=SMT, PackageReference=0603, PartNumber=CGA3E2X7R2A102K080AA, Polarized=N, Published=2008-06-19, Publisher="Texas Instruments", RoHS=Y, SizeArea_mm2=1.28, SizeAreaWB_mm2=4.68, SizeX_mm=1.6, SizeY_mm=0.8, SizeZ_mm=1, Supplier 1=Digi-Key, Supplier 2=Mouser, Supplier Part Number 2=810-CGA3E2X7R2A102K080AA, TaMax_C=125°C, TaMin_C=-55°C, Technology=Ceramic, U/M=EA, VDC_V=100V
C18 C29 C52 C62: library part CMP-0080702-1, "CAP, CERM, 0.1 µF, 16 V,+/- 5%, X7R, AEC-Q200 Grade 1, 0402", Cap_Case=0402, Manufacturer=MuRata, Supplier Part Number 1=490-16433-1-ND, TempCo=X7R, Tolerance_%=5%, Value2=16V, ValueDisplayed=0.1µF, AEC Category=Q200, AEC Grade=1, AEC Qualified=Y, Cap_F=100nF, ComponentLink1Description="Datasheet link", ComponentLink1URL=https://search.murata.co.jp/Ceramy/image/img/A01X/G101/ENG/GCM155R71C104JA55-01.pdf, CompType=Capacitor, MountType=SMT, PackageReference=0402, PartNumber=GCM155R71C104JA55D, Polarized=N, RoHS=Y, SizeArea_mm2=0.5, SizeAreaWB_mm2=3, SizeX_mm=1, SizeY_mm=0.5, SizeZ_mm=0.6, Supplier 1=Digi-Key, Supplier 2=Mouser, Supplier Part Number 2=81-GCM155R71C104JA5D, TaMax_C=125°C, TaMin_C=-55°C, Technology=Ceramic, U/M=EA, VDC_V=16V
C19 C53: library part CMP-0008013-2, "CAP, CERM, 4.7 uF, 25 V, +/- 10%, X7S, AEC-Q200 Grade 1, 0805", Cap_Case=0805, Manufacturer=MuRata, Supplier Part Number 1=81-GCM21BC71E475KE6L, TempCo=X7S, Tolerance_%=10%, Value1=Unknown, Value2=25V, ValueDisplayed=4.7uF, AEC Category=Q200, AEC Grade=1, AEC Qualified=Y, Cap_F=4.7µF, ComponentLink1Description="Datasheet link", ComponentLink1URL=http://psearch.en.murata.com/capacitor/product/GCM21BC71E475KE36%23.pdf, CompType=Capacitor, LatestRevisionDate=2017-03-09, MountType=SMT, PackageReference=0805, PartNumber=GCM21BC71E475KE36L, Polarized=N, Published=2008-06-19, Publisher="Texas Instruments", RoHS=Y, SizeArea_mm2=2.5, SizeAreaWB_mm2=6.75, SizeX_mm=2, SizeY_mm=1.25, SizeZ_mm=1.45, Supplier 1=Mouser, TaMax_C=125°C, TaMin_C=-55°C, Technology=Ceramic, U/M=EA, VDC_V=25V
C24 C26 C30 C58 C59: library part CMP-0007469-4, "CAP, CERM, 0.1 uF, 100 V, +/- 10%, X7R, 0603", Cap_Case=0603, Manufacturer=MuRata, Supplier Part Number 1=490-3285-1-ND, TempCo=X7R, Tolerance_%=10%, Value1=Unknown, Value2=100V, ValueDisplayed=0.1uF, AEC Category=Q200, AEC Qualified=?, Cap_F=100nF, ComponentLink1Description="Datasheet link", ComponentLink1URL=http://search.murata.co.jp/Ceramy/PnsearchViewAction.do?HnOFG=ON&HnNFG=ON&SEL_CNT=50&sLang=en&sKey=GRM188R72A104KA35D&x=9&y=9&search=startwith, CompType=Capacitor, LatestRevisionDate=2017-03-09, MountType=SMT, PackageReference=0603, PartNumber=GRM188R72A104KA35D, Polarized=N, Published=2008-06-19, Publisher="Texas Instruments", RoHS=Y, SizeArea_mm2=1.28, SizeAreaWB_mm2=4.68, SizeX_mm=1.6, SizeY_mm=0.8, SizeZ_mm=1, Supplier 1=Digi-Key, Supplier 2=Mouser, Supplier 3=Farnell, Supplier Part Number 2=81-GRM188R72A104KA35, Supplier Part Number 3=1828921, TaMax_C=125°C, TaMin_C=-55°C, Technology=Ceramic, U/M=EA, VDC_V=100V
C25 C47 C48 C50 C51 C78: library part CMP-0007077-5, "CAP, CERM, 0.1 uF, 25 V, +/- 10%, X7R, AEC-Q200 Grade 1, 0603", Cap_Case=0603, Manufacturer=TDK, Supplier Part Number 1=445-5667-1-ND, TempCo=X7R, Tolerance_%=10%, Value1=Unknown, Value2=25V, ValueDisplayed=0.1uF, AEC Category=Q200, AEC Grade=1, AEC Qualified=Y, Cap_F=100nF, ComponentLink1Description="Datasheet link", ComponentLink1URL=https://product.tdk.com/info/en/documents/chara_sheet/CGA3E2X7R1E104K080AA.pdf, CompType=Capacitor, LatestRevisionDate=2017-03-09, MountType=SMT, PackageReference=0603, PartNumber=CGA3E2X7R1E104K080AA, Polarized=N, Published=2008-06-19, Publisher="Texas Instruments", RoHS=Y, SizeArea_mm2=1.28, SizeAreaWB_mm2=4.68, SizeX_mm=1.6, SizeY_mm=0.8, SizeZ_mm=1, Supplier 1=Digi-Key, Supplier 2=Newark, Supplier 3=Mouser, Supplier Part Number 2=79Y4100, Supplier Part Number 3=810-CGA3E2X7R1E104K, TaMax_C=125°C, TaMin_C=-55°C, Technology=Ceramic, U/M=EA, VDC_V=25V
C27 C28 C60 C61: library part CMP-0007996-2, "CAP, CERM, 0.22 uF, 100 V, +/- 10%, X7R, 0805", Cap_Case=0805, Manufacturer="Samsung Electro-Mechanics", TempCo=X7R, Tolerance_%=10%, Value1=Unknown, Value2=100V, ValueDisplayed=0.22uF, AEC Category=Q200, AEC Qualified=?, Cap_F=0.22uF, ComponentLink1Description="Datasheet link", ComponentLink1URL=http://www.samsungsem.com/servlet/FileDownload?type=spec&file=CL21B224KCFSNWE.pdf, CompType=Capacitor, LatestRevisionDate=2017-03-09, MountType=SMT, PackageReference=0805, PartNumber=CL21B224KCFSNWE, Polarized=N, Published=2008-06-19, Publisher="Texas Instruments", RoHS=Y, SizeArea_mm2=2.5, SizeAreaWB_mm2=6.75, SizeX_mm=2, SizeY_mm=1.25, SizeZ_mm=1.45, TaMax_C=125°C, TaMin_C=-55°C, Technology=Ceramic, U/M=EA, VDC_V=100V
C31: library part CMP-0064936-4, "CAP, CERM, 4.7 uF, 16 V,+/- 10%, X7R, 0603", Cap_Case=0603, Manufacturer=MuRata, TempCo=X7R, Tolerance_%=10%, Value1=Unknown, Value2=16V, ValueDisplayed=4.7uF, AEC Category=Q200, AEC Grade=N/A, AEC Qualified=N, Cap_F=4.7µF, ComponentLink1Description="Datasheet link", ComponentLink1URL=http://search.murata.co.jp/Ceramy/image/img/A01X/G101/ENG/GRM188Z71C475KE21-01.pdf, CompType=Capacitor, LatestRevisionDate=2017-06-05, MountType=SMT, PackageReference=0603, PartNumber=GRM188Z71C475KE21D, Polarized=N, Published=2008-06-19, Publisher="Texas Instruments", RoHS=Y, SizeArea_mm2=1.28, SizeAreaWB_mm2=4.68, SizeX_mm=1.6, SizeY_mm=0.8, SizeZ_mm=1, TaMax_C=125°C, TaMin_C=-55°C, Technology=Ceramic, U/M=EA, VDC_V=16V
C32: library part CMP-0079154-1, "CAP, CERM, 1 µF, 16 V,+/- 10%, X7R, AEC-Q200 Grade 1, 0603", Cap_Case=0603, Manufacturer=MuRata, Supplier Part Number 1=490-12657-1-ND, TempCo=X7R, Tolerance_%=10%, Value2=16V, ValueDisplayed=1µF, AEC Category=Q200, AEC Grade=1, AEC Qualified=Y, Cap_F=1µF, ComponentLink1Description="Datasheet link", ComponentLink1URL=https://www.murata.com/~/media/webrenewal/support/library/catalog/products/capacitor/mlcc/c03e.ashx, CompType=Capacitor, MountType=SMT, PackageReference=0603, PartNumber=GCM188R71C105KA64J, Polarized=N, RoHS=Y, SizeArea_mm2=1.28, SizeAreaWB_mm2=4.68, SizeX_mm=1.6, SizeY_mm=0.8, SizeZ_mm=1, Supplier 1=Digi-Key, Supplier 2=Mouser, Supplier Part Number 2=81-GCM188R71C105KA4J, TaMax_C=125°C, TaMin_C=-55°C, Technology=Ceramic, U/M=EA, VDC_V=16V
C33 C63: library part CMP-0007508-5, "CAP, CERM, 1 uF, 50 V, +/- 10%, X7R, 0603", Cap_Case=0603, Manufacturer="Taiyo Yuden", Supplier Part Number 1=587-3247-1-ND, TempCo=X7R, Tolerance_%=10%, Value1=Unknown, Value2=50V, ValueDisplayed=1uF, AEC Category=Q200, AEC Qualified=?, Cap_F=1µF, ComponentLink1Description="Datasheet link", ComponentLink1URL=http://www.yuden.co.jp/ut/product/category/capacitor/UMK107AB7105KA-T.pdf, CompType=Capacitor, LatestRevisionDate=2017-03-09, MountType=SMT, PackageReference=0603, PartNumber=UMK107AB7105KA-T, Polarized=N, Published=2008-06-19, Publisher="Texas Instruments", RoHS=Y, SizeArea_mm2=1.28, SizeAreaWB_mm2=4.68, SizeX_mm=1.6, SizeY_mm=0.8, SizeZ_mm=1, Supplier 1=Digi-Key, Supplier 2=Newark, Supplier 3=Mouser, Supplier Part Number 2=45W1781, Supplier Part Number 3=963-UMK107AB7105KA-T, TaMax_C=125°C, TaMin_C=-55°C, Technology=Ceramic, U/M=EA, VDC_V=50V
C34 C35 C36 C37 C38 C39 C40 C41 C42 C43 C64 C65 C66 C67 C68 C69 C70 C71 C72 C76: library part CMP-0036912-1, "Cap Ceramic 22uF 25V X7R 20% Pad SMD 1210 +125°C Automotive T/R", Manufacturer=TDK, Operating Temperature Range="-55°C to +125°C", TempCo=15%, Temperature Characteristic=X7R, Tolerance_%=0.2%, ValueDisplayed=22uF, AEC Grade="Grade 1", AEC Qualified=Yes, Cap_F=22µF, ComponentLink1Description=Datasheet, ComponentLink1URL=https://product.tdk.com/info/en/catalog/spec/mlccspec_automotive_general_en.pdf, datasheet=https://product.tdk.com/info/en/catalog/spec/mlccspec_automotive_general_en.pdf, Datasheet Path=datasheets/Cap-CGA6P3X7R1E226M250AB.pdf, helpURL=https://upverter.com/upn/revision/061270d54d6f8474/, Lead Free=Yes, PackageReference=1210, Part Number=CGA6P3X7R1E226M250AB, PartNumber=CGA6P3X7R1E226M250AB, RoHS=TRUE, SizeZ_mm=2.8mm, VDC_V=25V
C44 C45 C46 C73 C74 C75: library part CMP-0012661-3, "CAP, Tantalum Polymer, 220 uF, 10 V, +/- 20%, 0.025 ohm, AEC-Q200 Grade 1, 7343-31 SMD", Cap_Case=7.3x4.3x3.1mm, Manufacturer=Kemet, Supplier Part Number 1=399-12102-1-ND, Tolerance_%=20%, Value1="0.025 ohm", Value2=10V, ValueDisplayed=220uF, AEC Category=Q200, AEC Grade=1, AEC Qualified=Y, Cap_F=220µF, ComponentLink1Description="Datasheet link", ComponentLink1URL=http://www.kemet.com/Lists/ProductCatalog/Attachments/637/KEM_T2073_T591_T598.pdf, CompType=Capacitor, ESR_ohm=0.025, IRMS_A=3A, MountType=SMT, PackageReference=7343-31, PartNumber=T598D227M010ATE025, Polarized=Y, RoHS=Y, Series=T598, SizeArea_mm2=31.39, SizeAreaWB_mm2=58.59, SizeX_mm=7.3, SizeY_mm=4.3, SizeZ_mm=3.1, Supplier 1=Digi-Key, Supplier 2=Mouser, Supplier 3=Farnell, Supplier Part Number 2=80-T598D227M010E025, Supplier Part Number 3=2491741, TaMax_C=125°C, TaMin_C=-55°C, Technology="Tantalum Polymer", VDC_V=10V
C49 C77: "CAP, CERM, 100 pF, 100 V, +/- 5%, C0G/NP0, AEC-Q200 Grade 1, 0603", Cap_Case=0603, Manufacturer=MuRata, Supplier Part Number 1=490-4771-1-ND, TempCo=C0G/NP0, Tolerance_%=5%, Value1=Unknown, Value2=100V, ValueDisplayed=100pF, AEC Category=Q200, AEC Grade=1, AEC Qualified=Y, Cap_F=100pF, ComponentLink1Description="Datasheet link", ComponentLink1URL=http://psearch.murata.com/capacitor/product/GCM1885C2A101JA16%23.pdf, CompType=Capacitor, LatestRevisionDate=2017-03-09, MountType=SMT, PackageReference=0603, PartNumber=GCM1885C2A101JA16D, Polarized=N, Published=2008-06-19, Publisher="Texas Instruments", RoHS=Y, SizeArea_mm2=1.28, SizeAreaWB_mm2=4.68, SizeX_mm=1.6, SizeY_mm=0.8, SizeZ_mm=1, Supplier 1=Digi-Key, Supplier 2=Mouser, Supplier Part Number 2=81-GCM1885C2A101JA6D, TaMax_C=125°C, TaMin_C=-55°C, Technology=Ceramic, U/M=EA, VDC_V=100V
C79: library part CMP-0006768-4, "CAP, CERM, 150 pF, 50 V, +/- 5%, C0G/NP0, 0603", Cap_Case=0603, Manufacturer=AVX, Supplier Part Number 1=478-1177-1-ND, TempCo=C0G/NP0, Tolerance_%=5%, Value1="0.098 ohm", Value2=50V, ValueDisplayed=150pF, AEC Category=Q200, AEC Grade=N/A, AEC Qualified=N, Cap_F=150pF, ComponentLink1Description="Datasheet link", ComponentLink1URL=http://datasheets.avx.com/C0GNP0-Dielectric.pdf, CompType=Capacitor, ESR_ohm=0.098, LatestRevisionDate=2017-03-09, MountType=SMT, PackageReference=0603, PartNumber=06035A151JAT2A, Polarized=N, Published=2008-06-19, Publisher="Texas Instruments", RoHS=Y, SizeArea_mm2=1.28, SizeAreaWB_mm2=4.68, SizeX_mm=1.6, SizeY_mm=0.8, SizeZ_mm=1, Supplier 1=Digi-Key, Supplier 2=Newark, Supplier 3=Mouser, Supplier Part Number 2=09J2473, Supplier Part Number 3=581-06035A151J, TaMax_C=125°C, TaMin_C=-55°C, Technology=Ceramic, U/M=EA, VDC_V=50V
C80: library part CMP-0006942-4, "CAP, CERM, 4700 pF, 50 V, +/- 5%, X7R, 0603", Cap_Case=0603, Manufacturer=Kemet, Supplier Part Number 1=399-1088-1-ND, TempCo=X7R, Tolerance_%=5%, Value1=Unknown, Value2=50V, ValueDisplayed=4700pF, AEC Category=Q200, AEC Qualified=?, Cap_F=4.7nF, ComponentLink1Description="Datasheet link", ComponentLink1URL=http://www.kemet.com/kemet/web/homepage/kechome.nsf/vapubfiles/F3102_Y5V.pdf/$file/F3102_Y5V.pdf, CompType=Capacitor, LatestRevisionDate=2017-03-09, MountType=SMT, PackageReference=0603, PartNumber=C0603C472J5RACTU, Polarized=N, Published=2008-06-19, Publisher="Texas Instruments", RoHS=Y, SizeArea_mm2=1.28, SizeAreaWB_mm2=4.68, SizeX_mm=1.6, SizeY_mm=0.8, SizeZ_mm=1, Supplier 1=Digi-Key, Supplier 2=Mouser, Supplier 3=Farnell, Supplier Part Number 2=80-C0603C472J5R, Supplier Part Number 3=9934952, TaMax_C=125°C, TaMin_C=-55°C, Technology=Ceramic, U/M=EA, VDC_V=50V
C81 C82: "CAP, CERM, 0.1 uF, 100 V, +/- 10%, X7R, 0603", Cap_Case=0603, Manufacturer=MuRata, Supplier Part Number 1=490-3285-1-ND, TempCo=X7R, Tolerance_%=10%, Value1=Unknown, Value2=100V, ValueDisplayed=0.1uF, AEC Category=Q200, AEC Qualified=?, Cap_F=100nF, ComponentLink1Description="Datasheet link", ComponentLink1URL=http://search.murata.co.jp/Ceramy/PnsearchViewAction.do?HnOFG=ON&HnNFG=ON&SEL_CNT=50&sLang=en&sKey=GRM188R72A104KA35D&x=9&y=9&search=startwith, CompType=Capacitor, LatestRevisionDate=2017-03-09, MountType=SMT, PackageReference=0603, PartNumber=GRM188R72A104KA35D, Polarized=N, Published=2008-06-19, Publisher="Texas Instruments", RoHS=Y, SizeArea_mm2=1.28, SizeAreaWB_mm2=4.68, SizeX_mm=1.6, SizeY_mm=0.8, SizeZ_mm=1, Supplier 1=Digi-Key, Supplier 2=Mouser, Supplier 3=Farnell, Supplier Part Number 2=81-GRM188R72A104KA35, Supplier Part Number 3=1828921, TaMax_C=125°C, TaMin_C=-55°C, Technology=Ceramic, U/M=EA, VDC_V=100V
C83: "CAP, CERM, 0.01 uF, 100 V, +/- 10%, X7R, 0603", Cap_Case=0603, Manufacturer=MuRata, Supplier Part Number 1=GRM188R72A103KA01D-ND, TempCo=X7R, Tolerance_%=10%, Value1=Unknown, Value2=100V, ValueDisplayed=0.01uF, AEC Category=Q200, AEC Qualified=?, Cap_F=10nF, ComponentLink1Description="Datasheet link", ComponentLink1URL=http://search.murata.co.jp/Ceramy/PnsearchViewAction.do?HnOFG=ON&HnNFG=ON&SEL_CNT=50&sLang=en&sKey=GRM188R72A103KA01D&x=9&y=9&search=startwith, CompType=Capacitor, LatestRevisionDate=2017-03-09, MountType=SMT, PackageReference=0603, PartNumber=GRM188R72A103KA01D, Polarized=N, Published=2008-06-19, Publisher="Texas Instruments", RoHS=Y, SizeArea_mm2=1.28, SizeAreaWB_mm2=4.68, SizeX_mm=1.6, SizeY_mm=0.8, SizeZ_mm=1, Supplier 1=Digi-Key, Supplier 2=Mouser, Supplier Part Number 2=81-GRM188R72A103KA1D, TaMax_C=125°C, TaMin_C=-55°C, Technology=Ceramic, U/M=EA, VDC_V=100V
C84: "CAP, CERM, 1000 pF, 100 V, +/- 10%, X7R, AEC-Q200 Grade 1, 0603", Cap_Case=0603, Manufacturer=TDK, Supplier Part Number 1=445-5806-1-ND, TempCo=X7R, Tolerance_%=10%, Value1="1.97137 ohm", Value2=100V, ValueDisplayed=1000pF, AEC Category=Q200, AEC Grade=1, AEC Qualified=Y, Cap_F=0.001uF, ComponentLink1Description="Datasheet link", ComponentLink1URL=https://product.tdk.com/en/search/capacitor/ceramic/mlcc/info?part_no=CGA3E2X7R2A102K080AA, CompType=Capacitor, ESR_ohm=1.9714, IRMS_A=305.705mA, LatestRevisionDate=2017-03-09, MountType=SMT, PackageReference=0603, PartNumber=CGA3E2X7R2A102K080AA, Polarized=N, Published=2008-06-19, Publisher="Texas Instruments", RoHS=Y, SizeArea_mm2=1.28, SizeAreaWB_mm2=4.68, SizeX_mm=1.6, SizeY_mm=0.8, SizeZ_mm=1, Supplier 1=Digi-Key, Supplier 2=Mouser, Supplier Part Number 2=810-CGA3E2X7R2A102K080AA, TaMax_C=125°C, TaMin_C=-55°C, Technology=Ceramic, U/M=EA, VDC_V=100V
GND1: library part CMP-0055148-1, "Test Point, Multipurpose, Black, TH", Color=Black, Manufacturer=Keystone, PartNumber=5011, Supplier Part Number 1=36-5011-ND, CNHeader=FALSE, ComponentLink1Description="Datasheet URL", ComponentLink1URL=http://www.keyelco.com/userAssets/file/M60-2p60.pdf, CompType="Test Point", ContactFinish=Silver, CT=TRUE, Green_EU RoHS=Passed, Green_EU RoHS-2=Incomplete, Green_Lifecycle=Active, Green_REACh=Passed, LatestRevisionDate=26/05/2017, MountType=TH, PackageReference="Black Multipurpose Testpoint", Publisher="Texas Instruments", RoHS=Y, Supplier 1=Digi-Key, Supplier 2=Mouser, Supplier Part Number 2=534-5011
J1 J2: library part CMP-0077513-2, "Terminal Block, 10.16mm, 2x1, Tin, R/A, TH", Color=Green, Current_A=65A, Manufacturer=Eaton, Supplier Part Number 1=283-4339-ND, Voltage_V=300V, Cert_CULUS=Y, ComponentLink1Description="Datasheet URL", ComponentLink1URL=http://www.cooperindustries.com/content/dam/public/bussmann/Electronics/Resources/product-datasheets/Connectors/Bus_Elx_DS_EM2929_High_Current.pdf, CompType="Terminal Block", ContactFinish=Tin, Gender=Female, MountType=TH, Orientation=R/A, PackageReference="Terminal Block, 10.16mm, 2x1, TH", PartNumber=EM292902-UL, PinCount=2, Pitch_mm=10.16, RoHS=Y, Row_Count=1, Supplier 1=Digi-Key, Supplier 2=Newark, Supplier 3=Mouser, Supplier Part Number 2=79T1137, Supplier Part Number 3=504-EM292902-UL
J3: library part CMP-0075428-1, "Header, 100mil, 14x1, Gold, TH", Color=Black, Current_A=6.3A, Manufacturer=Samtec, Supplier Part Number 1=SAM1029-14-ND, Voltage_V=550V, Cert_CSA=Y, Cert_CULUS=N, Cert_UL=Y, Cert_VDE=N, ClassName=Header, CNHeader=True, ComponentLink1Description="Datasheet URL", ComponentLink1URL=http://samtec.com/ftppub/pdf/TSW_TH.PDF, CompType=Header, ContactFinish=Gold, CT=False, Gender=Male, Green_EU RoHS=Passed, Green_EU RoHS-2=Passed, Green_Lifecycle=Active, Green_REACh=Passed, LatestRevisionDate=2017-07-12, MountType=TH, Orientation=Vertical, PackageReference="14x1 Header", PartNumber=TSW-114-07-G-S, PinCount=14, Pitch_mm=2.54, Publisher="Texas Instruments", RoHS=Y, Row_Count=1, Shrouded=N, Supplier 1=Digi-Key
J4: "Header, 100mil, 2x1, Gold, TH", Manufacturer="TE Connectivity", ClassName=Header, CNHeader=TRUE, ComponentLink1Description="Datasheet URL", ComponentLink1URL=https://sps06.itg.ti.com/sites/KMS/crossdivteams/altium/docs/ComponentDatasheets/ENG_CD_146261_G2.pdf, CompType=Header, CT=FALSE, Green_EU RoHS=Passed, Green_EU RoHS-2=Incomplete, Green_Lifecycle=Active, Green_REACh=Passed, LatestRevisionDate=26/05/2017, MountType=TH, PackageReference="Header, 2x1, 100mil", PartNumber=5-146261-1, Publisher="Texas Instruments", RoHS=Y
J5 J6: "Connector, MMCX 50 ohm, TH", Manufacturer=Samtec, Supplier Part Number 1=88K0549, CNHeader=False, ComponentLink1Description="Datasheet URL", ComponentLink1URL=http://suddendocs.samtec.com/prints/mmcx-j-p-x-st-th1-mkt.pdf, CompType=Connector, CT=False, Gender=Female, LatestRevisionDate=2017-07-12, MountType=TH, Orientation=Vertical, PackageReference="Connector, MMCX, TH", PartNumber=MMCX-J-P-H-ST-TH1, Publisher="Texas Instruments", RoHS=Y, Supplier 1=Newark
L1: library part CMP-0086238-1, "Inductor, 1 µH, 30 A, 0.00276 ohm, AEC-Q200 Grade 0, SMD", Manufacturer=Cyntec, Value1="0.00276 ohm", Value2=30A, ValueDisplayed=1µH, AEC Category=Q200, AEC Grade=0, AEC Qualified=Y, ComponentLink1Description="Datasheet link", ComponentLink1URL=http://www.cyntec.com/upfile/products/download/VCHA105D.pdf, CompType=Inductor, DCR_ohm=2.76m, Imax_A=30A, Ind_H=1µH, Irms="30A @ 40C rise", Isat="37A @ 30% inductance drop", Material=?, MountType=SMT, PackageReference=10.85x10mm, PartNumber=VCHA105D-1R0MS6, RoHS=Y, SizeArea_mm2=108.5, SizeAreaWB_mm2=154.2, SizeX_mm=10.85, SizeY_mm=10, SizeZ_mm=5.4, Technology=?
L2: library part CMP-0084205-1, "Coupled inductor, 16 µH, 0.0027 ohm, TH", Manufacturer="Wurth Elektronik", ValueDisplayed=16µH, AEC Category=Q200, AEC Grade=N/A, AEC Qualified=N, ComponentLink1Description="Datasheet URL", ComponentLink1URL=http://katalog.we-online.de/pbs/datasheet/7448421016.pdf, CompType="Coupled Inductor", DCR_ohm=2.7m, Ind_H=16µH, MountType=TH, PackageReference=18.5x14.5mm, PartNumber=7448421016, RoHS=Y
L3 L4: library part CMP-0047844-1, "Power Choke Coil 2.5uH 20% 100kHz 2.53mOhm 32A AECQ200 13.3x12.8x8.0mm SMT", Manufacturer=CYNTEC, Operating Temperature Range="-55°C to +180°C", Test Frequency=100kHz, Tolerance_%=20%, AEC Grade="Grade 0", AEC Qualified=Yes, Datasheet Path=datasheets/Ind-VCUD128T-2R5MS8.pdf, DCR_ohm=2.53m, helpURL=https://upverter.com/upn/revision/c76fce19a578f743/, Ind_H=2.5µH, Irms=32A, Isat=30A, Lead Free=Yes, Material="Metal Dust", PackageReference=SMT_IND_13MM3_12MM8, Part Number=VCUD128T-2R5MS8, PartNumber=VCUD128T-2R5MS8, RoHS=TRUE, SizeZ_mm=8mm
NT2: library part CMP-0078142-6, "Single point connection between nets.", Manufacturer=N/A, CompType=Net-Tie, MountType=SMT, PackageReference=N/A, PartNumber=N/A
PGND1: library part 5011, "Test Point, Multipurpose, Black, TH", Color=Black, Manufacturer=Keystone, Supplier Part Number 1=36-5011-ND, CNHeader=FALSE, ComponentLink1Description="Datasheet URL", ComponentLink1URL=http://www.keyelco.com/userAssets/file/M60-2p60.pdf, CompType="Test Point", ContactFinish=Silver, CT=TRUE, Green_EU RoHS=Passed, Green_EU RoHS-2=Incomplete, Green_Lifecycle=Active, Green_REACh=Passed, LatestRevisionDate=26/05/2017, MountType=TH, PackageReference="Black Multipurpose Testpoint", PartNumber=5011, Publisher="Texas Instruments", RoHS=Y, Supplier 1=Digi-Key, Supplier 2=Mouser, Supplier Part Number 2=534-5011
Q1 Q2: "MOSFET, N-CH, 30 V, 51 A, DNK0008A (VSON-CLIP-8)", Alternate Manufacturer=None, Manufacturer="Texas Instruments", Value1=0.007, Value2="97 nC", AEC Category=Q101, AEC Qualified=N, ChType=N, ComponentLink1Description="Datasheet link", ComponentLink1URL=http://www.ti.com/lit/ds/symlink/csd17570q5b.pdf, CompType=MOSFET, IdsMax_A=51A, MountType=SMT, PackageReference=DNK0008A, PartNumber=CSD17570Q5B, QgTyp_nC=97, Rdson45_ohm=7.6m, RoHS=Y, SizeArea_mm2=30, SizeAreaWB_mm2=56, SizeX_mm=6, SizeY_mm=5, SizeZ_mm=1, U/M=EA, VdsMax_V=30V, Vgs_V=20V